# Altium PCB PCB_LogNController-v1.1.PcbDoc (part 3 of 3)
Units mil, origin at the board's own origin, x right, y up, seen from the top; angles counter-clockwise.
Board outline 7018 x 7081 mil, 2 copper layers (Top Layer, Bottom Layer), stack 61.811 mil thick; 172 components, 114 nets, 574 pads, 361 vias.
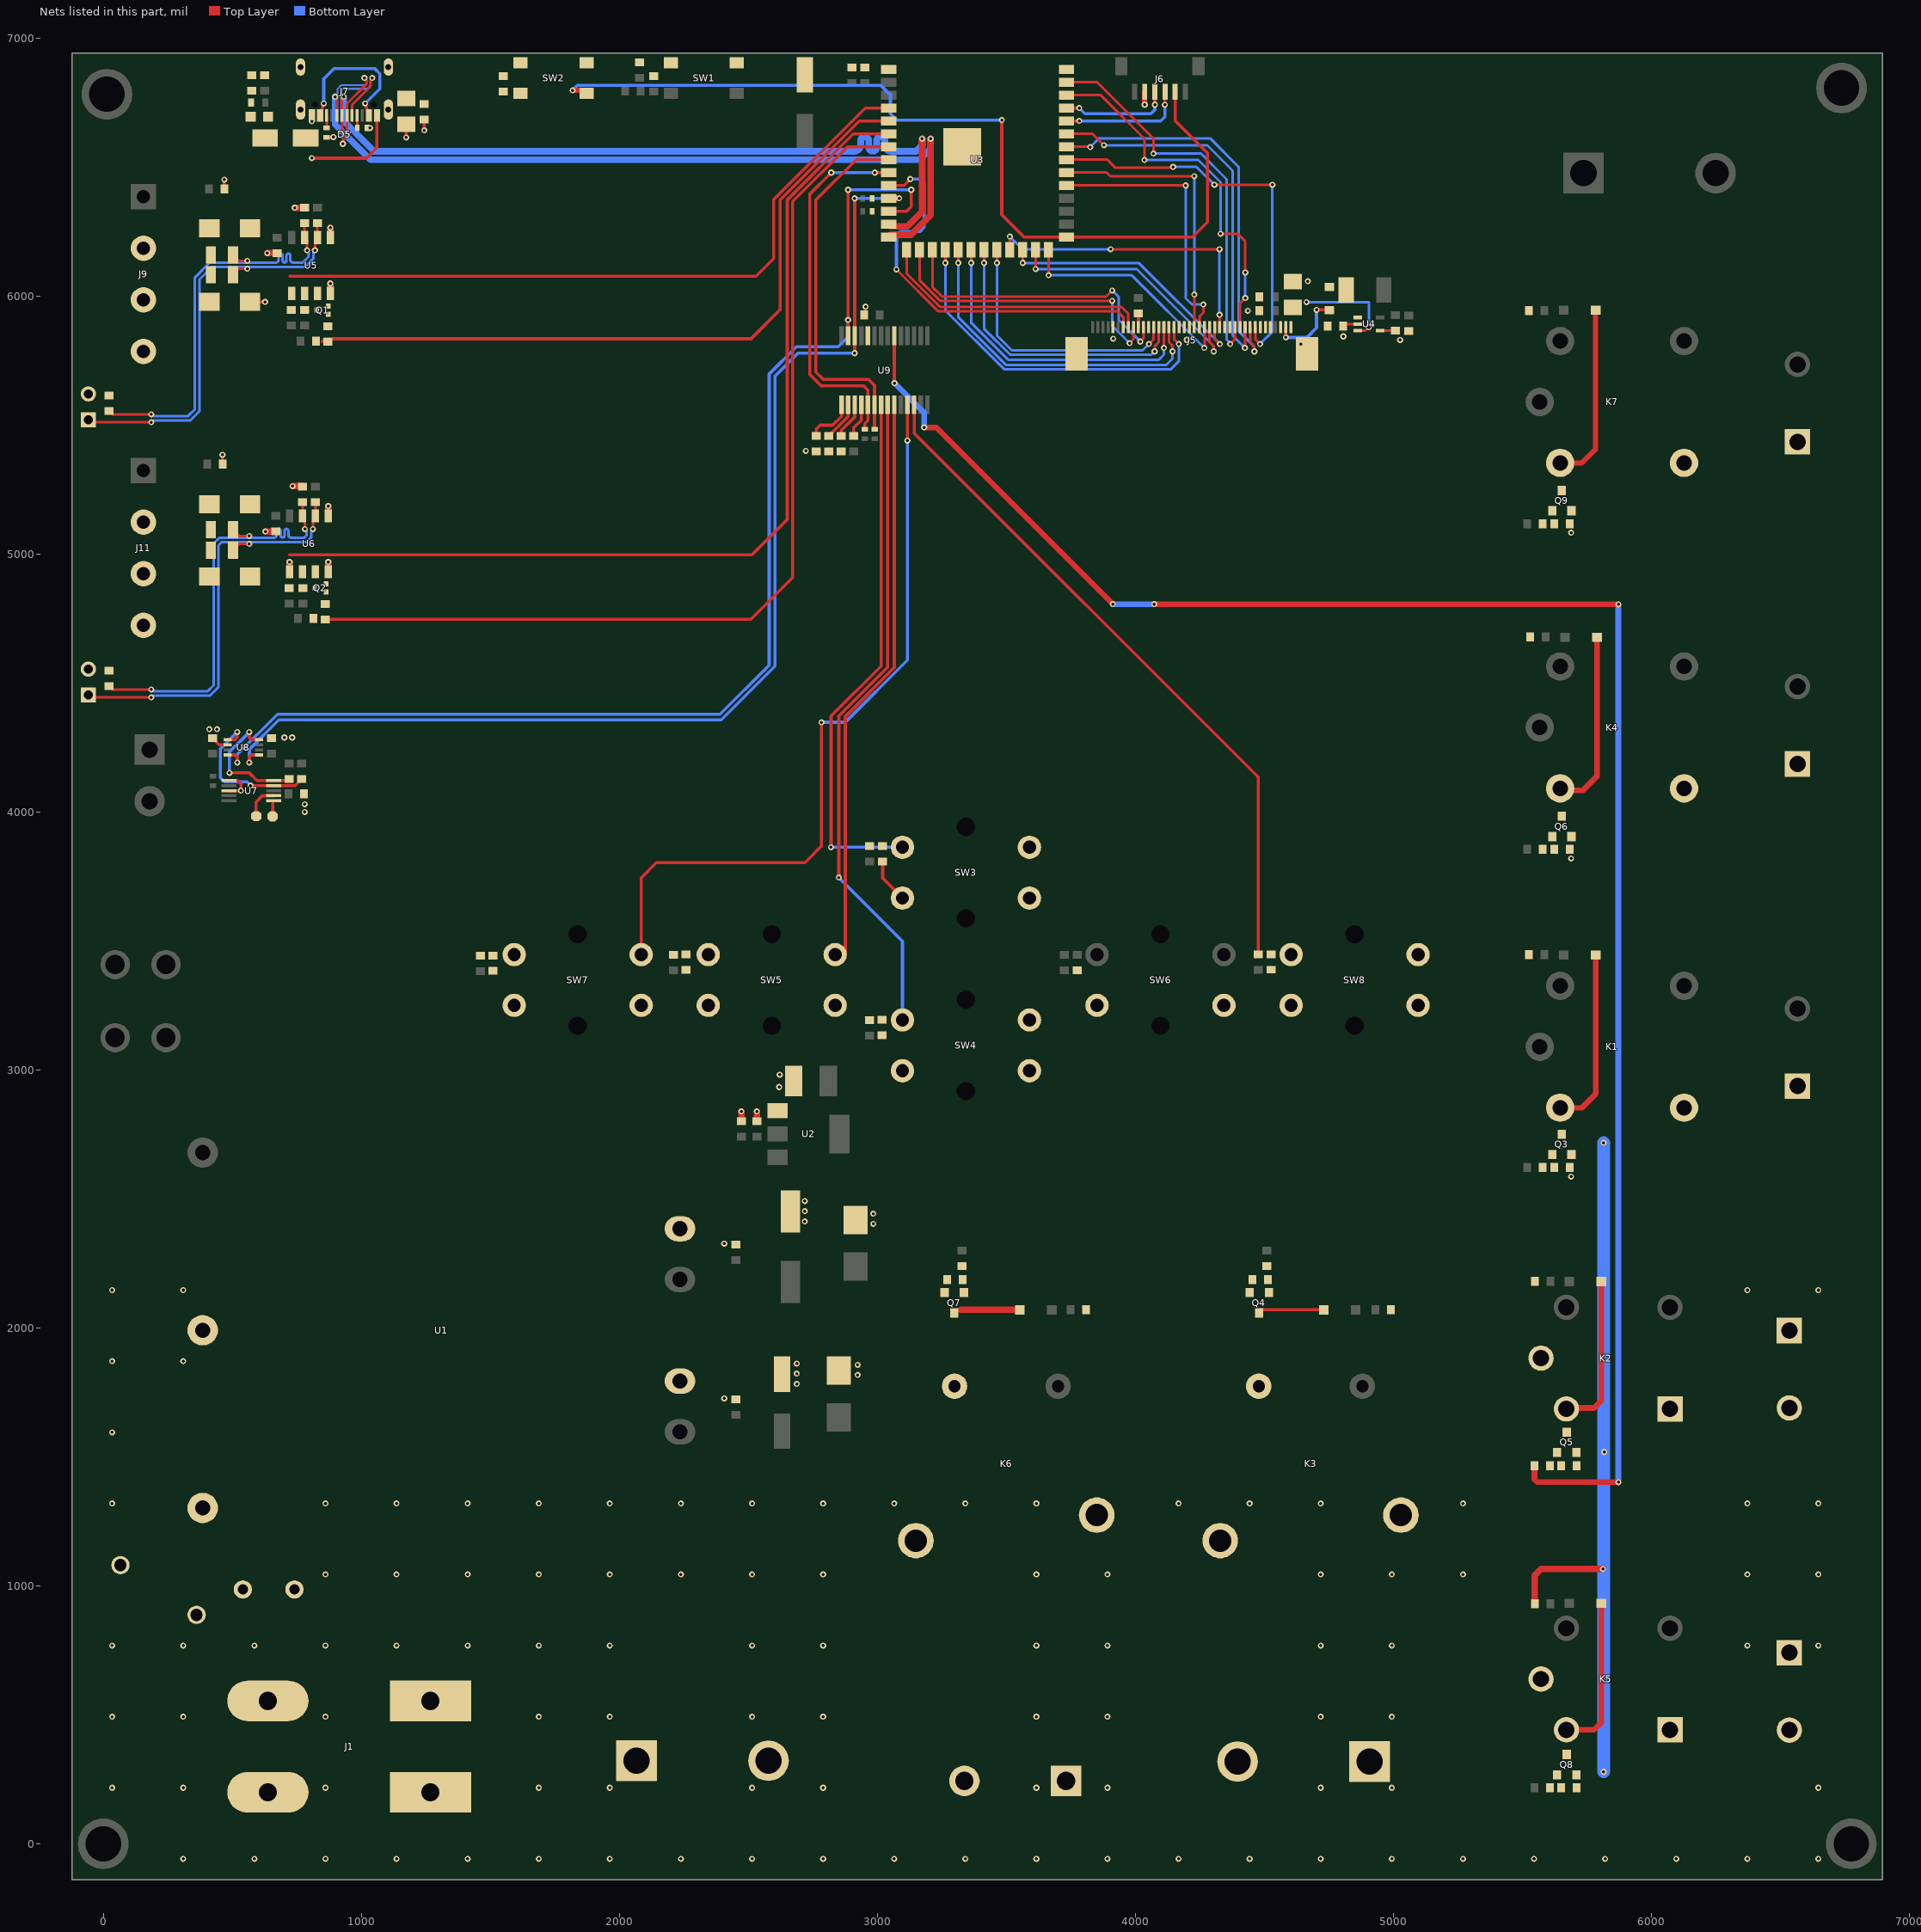
[diagram p2: the nets of this part, all layers, seen from the top]

## Via types
v1: diameter 23.62, hole 11.81, Top Layer to Bottom Layer, 245 vias
v2: diameter 23.62, hole 11.81, Top Layer to Bottom Layer, tented both sides, 116 vias

## Nets (pads, with @x,y where several pads share a name; then routed paths per layer and width w, separated by ;. In a path a pad name is that pad's centre, name@x,y a point inside that pad or via, vN(x,y) a via of type N, cw(c..) or ccw(c..) an arc to the next point about the centre after c; other vN are vias at no path point) (continued)
GND: C1.2 C2.1 C3.2 C4.1 C5.2 C6.1 C7.1 C8.1 C9.2 C10.2 C11.1 C12.1 C13.1 C14.1 C15.2 C16.1 C17.1 C18.1 C19.1 C20.1 C21.2 C22.1 C23.2 C24.1 C25.1 C26.2 C27.2 C28.2 C29.2 C30.2 C31.2 C32.2 C33.2 C34.2 C35.2 C36.2 C37.2 C38.2 C39.2 C40.2 C41.2 D1.1 D2.1 D5.1 D6.2 D7.1 D8.2 D9.1 J5.5 J5.12 J5.18 J5.19 J5.20 J5.27 J5.28 J5.34 J5.35 J5.36 J5.38 J5.MP1 J5.MP2 J6.2 J7.A1/B12 J7.B1/A12 J9.4 J11.4 Q1.2 Q2.2 Q3.2 Q4.2 Q5.2 Q6.2 Q7.2 Q8.2 Q9.2 R4.2 R5.2 R6.1 R8.1 R10.2 R17.2 R33.2 R34.2 R37.2 R39.1 R42.1 R43.1 R46.1 R47.1 R49.1 R51.1 SW1.1 SW1.2 SW2.1 SW2.2 SW3.3 SW3.4 SW4.3 SW4.4 SW5.3 SW5.4 SW6.3 SW6.4 SW7.3 SW7.4 SW8.3 SW8.4 U1.5 U1.8 U2.1 U3.1 U3.40 U3.41 U4.2 U5.4 U5.5 U6.4 U6.5 U7.1 U7.3 U8.2 U9.10 | length 4392.4
  Top Layer w10: C19.1@4806,5884.74 4813,5891.74 U4.2@4863,5891.74
  Top Layer w12: C27.2@423.51,4286 448.66,4260.84 U8.2@481.48,4260.84 ; C24.1@462,5349 v1(462,5385) ; C22.1@469,6416 v1(469,6452) ; U7.3@486.89,4083 528,4083 529,4082 v1@529.12,4082.12 ; U7.1@486.89,4122.37 520.63,4122.37 533.13,4109.87 v1(533.13,4083.12) ; D7.1@568.74,5978 v1(627,5978) ; v1(808,6535) 1020,6535 1060.71,6575.71 J7.A1/B12@1060.71,6700.99 ; v1(808,6678) 808.74,6678.74 J7.B1/A12@808.74,6700.99 ; R5.2@866,6616 891,6616 v1(892,6617) ; v1(928.67,6590.67) 930.9,6592.9 930.9,6619.37 D5.1@934.68,6623.16 ; R4.2@1021.5,6652 v1(1034,6652) ; v1(1174,6615) C20.1@1174,6667 ; v1(1244,6643) R6.1@1244,6685 ; C28.2@3021,3808 3021,3743.51 SW3.4@3097.94,3666.57 ; v1@5690,3822 v1@5690,3823
  Top Layer w20: v2(4036.94,6742.32) J6.2@4036.94,6792.3
  Top Layer w25: v1(628,5087.81) 665.92,5087.81 C23.2@666,5087.73 ; v1(636,6167) C21.2@674,6167 ; v1(734,5263.73) R17.2@772,5263.73 ; v1(742,6343) R10.2@780,6343 ; U6.4@872,4931.73 v1(872,4969.73) ; U6.5@872,5148.27 v1(872,5186.27) ; U5.4@880,6011 v1(880,6049) ; U5.5@880,6227.54 v1(880,6265.54) ; C6.1@2473.37,2802 v1(2473.37,2839.63) ; C7.1@2533.37,2802 v1(2533.37,2839.63) ; C40.2@5549,930 5549,1040 5574,1065 v1(5813,1065)
  Bottom Layer w50: v1(5816,279) 5816,1065 5816,1431 5816,1519 v1(5816,2718)
  other v1: 5818,1519 2407,1727 2688,1783 2924,1817.5 2688,1822.5 2924,1857 2688,1862 2407,2327 2985,2403.5 2719,2413 2985,2443 2719,2452.5 2719,2492 5690,2587 2620,2934 2622,2982 5690,3820 781,4000 781,4030 702,4289 732,4289 411,4321 441,4321 5690,5082.5
  other v2: 2723,5400 4641.46,5814.71 5027,5830 4199.69,5830.63 3915,5835 4807,5844 4436.63,5943.31 2954.87,5959 4669,6058
I2C_SCL: R3.1 U3.11 U8.5 U9.12 | length 4567.2
  Top Layer w12: v1(566.01,4192) 566.01,4212 575.48,4221.47 U8.5@603.53,4221.47 ; v2(2912.71,5779) U9.12@2912.71,5846.86 v2(2912.71,6379)
  Top Layer w20: U3.11@3044.31,6379.21 v2(3085,6379.21)
  Bottom Layer w12: v1(566.01,4192) 566.01,4243.01 680,4357 2395.54,4357 2604,4565.46 2604,5690 2693,5779 v2(2912.71,5779) ; v2@2912.81,6379.11 v2@3084.89,6379.11
  Bottom Layer w20: v2(2912.71,6379) v2@2912.81,6379.11 ; v2@3084.89,6379.11 v2(3085,6379.21)
I2C_SDA: R2.1 U3.12 U8.4 U9.13 | length 4827.7
  Top Layer w12: U8.4@481.48,4221.47 509.53,4221.47 519,4212 v1(519,4192) ; U9.13@2887.12,5846.86 v2(2887.12,5908) v2@2887.12,6411 ; U3.12@3044.31,6329.21 3114.21,6329.21 3132,6347 v2(3132,6412.45)
  Bottom Layer w12: v1(519,4192) 519,4222.87 675.13,4379 2390.67,4379 2581,4569.33 2581,5698 2687,5804 2849,5804 2887.12,5842.12 v2(2887.12,5908) ; v2(2887.12,6412.45) v2(3132,6412.45)
INTA: R36.1 U3.8 U9.20 | length 1432.7
  Top Layer w12: R36.1@2991,5484.5 2989.48,5486.02 U9.20@2989.48,5579.14 2989.48,5653.52 2966,5677 2791,5677 2762.24,5705.76 2762.24,6373.24 2918.21,6529.21 U3.8@3044.31,6529.21
INTB: R35.1 U3.9 U9.19 | length 1447.1
  Top Layer w12: v2(2822,6479) 2738,6395 2738,5697 2782,5653 2947,5653 2963.89,5636.11 U9.19@2963.89,5579.14 2963.89,5518.02 2952,5506.13 2952,5487.5 2952.57,5486.93 R35.1@2952.57,5484.5 ; v2(2991,6479) 2991.21,6479.21 U3.9@3044.31,6479.21
  Bottom Layer w12: v2(2822,6479) v2(2991,6479)
IO0: C15.1 J6.5 SW2.3 SW2.4 U3.27 | length 3610.4
  Top Layer w12: v2(3483,6683) 3483,6316 3569.79,6229.21 U3.27@3733.29,6229.21 4222.21,6229.21 4280,6287 4280,6555 4155.06,6679.94 J6.5@4155.06,6792.3
  Top Layer w20: v2(1819,6798) 1861.9,6798 SW2.4@1872.95,6786.95
  Bottom Layer w12: v2(1819,6798) 1839,6818 3013,6818 3051,6780 3051,6707 3075,6683 v2(3483,6683)
LCD_B3: J5.17 U3.18 | length 1388.2
  Top Layer w10: v2(3264,6129) U3.18@3264,6180 U3.18@3264.22,6180.22 ; J5.17@4150.51,5880.37 4150.54,5833.16 v2(4169,5814.71)
  Bottom Layer w10: v2(3264,6129) 3264,5945 3492,5717 4139,5717 4169,5747 v2(4169,5814.71)
LCD_B4: J5.16 U3.19 | length 1306.9
  Top Layer w10: v2(3314,6129) U3.19@3314,6180 ; J5.16@4130.86,5880.37 4130.86,5821.52 4145.19,5807.19 v2(4145.19,5785.71)
  Bottom Layer w10: v2(3314,6129) 3314,5919.04 3499.04,5734 4121,5734 4145.19,5758.19 v2(4145.19,5785.71)
LCD_B5: J5.15 U3.20 | length 1204.8
  Top Layer w10: v2(3364,6129) U3.20@3364,6180 ; v2@4110.36,5799.71 4111.18,5800.53 J5.15@4111.16,5880.37
  Bottom Layer w10: v2(3364,6129) 3364,5897.33 3507.33,5754 4092,5754 4111.36,5773.36 v2(4111.36,5799.71)
LCD_B6: J5.14 U3.21 | length 1115.7
  Top Layer w10: v2(3414,6129) U3.21@3414,6180 ; v2(4075.36,5785.71) 4075.36,5805.38 4091.49,5821.52 J5.14@4091.51,5880.37
  Bottom Layer w10: v2(3414,6129) 3414,5874.2 3515.2,5773 4062.65,5773 v2(4075.36,5785.71)
LCD_B7: J5.13 U3.22 | length 1028.8
  Top Layer w10: v2(3464,6129) U3.22@3464,6180 ; v2(4053.36,5814.71) 4071.81,5833.16 J5.13@4071.81,5880.37
  Bottom Layer w10: v2(3464,6129) 3464,5848.24 3522.24,5790 4028.65,5790 v2(4053.36,5814.71)
LCD_DE: J5.7 U3.10 | length 1572.4
  Top Layer w10: v2(3074.5,6103.5) 3237,5941 3931.7,5941 3953.71,5918.99 J5.7@3953.71,5880.37
  Top Layer w12: U3.10@3044.31,6429.21 3103.21,6429.21 v2(3128,6454)
  Bottom Layer w12: v2(3074.5,6103.5) 3074.5,6236.5 3089,6251 3166,6251 3182,6267 3182,6437 3165,6454 v2(3128,6454)
LCD_DISP: J5.10 R52.1 | length 54.3
  Top Layer w12: R52.1@4011,5934 4012.71,5932.29 J5.10@4012.71,5880.37
LCD_G2: J5.26 U3.23 | length 1191.2
  Top Layer w10: U3.23@3514,6180 v2(3514,6231) ; v2(3905,6182) v2(4327,6182) v2@4332,6182 ; v2(4327,5928) 4327.71,5927.29 J5.26@4327.71,5880.37
  Bottom Layer w10: v2(3514,6231) 3563,6182 v2(3905,6182) ; v2(4327,5928) v2(4327,6182)
LCD_G3: J5.25 U3.24 | length 1020.6
  Top Layer w10: v2(3564,6129) U3.24@3564,6180 ; J5.25@4308.01,5880.37 4308.04,5833.16 4326.5,5814.71 v2(4328.31,5814.71)
  Bottom Layer w10: v2(3564,6129) 4014.02,6129 v2(4328.31,5814.71)
LCD_G4: J5.24 U3.25 | length 1015.3
  Top Layer w10: v2@3614,6101 U3.25@3614,6180 ; J5.24@4288.36,5880.37 4288.36,5821.52 4304.5,5805.38 v2(4304.5,5785.71)
  Bottom Layer w10: v2(3614,6105) 4006,6105 4304.5,5806.5 v2(4304.5,5785.71)
LCD_G5: J5.23 U3.26 | length 900.4
  Top Layer w10: v2(3664,6081) U3.26@3664,6180 ; v2(4267.86,5799.71) 4268.68,5800.53 J5.23@4268.68,5880.37
  Bottom Layer w10: v2(3664,6081) 3986.57,6081 v2(4267.86,5799.71)
LCD_G6: J5.22 U3.31 | length 1071.7
  Top Layer w10: U3.31@3733.29,6429.21 4195.79,6429.21 v2(4196,6429) ; J5.22@4248.96,5880.37 4248.99,5920.99 4264.19,5936.19 v2(4264.19,5968)
  Bottom Layer w10: v2@4196.48,6429 4196.48,5991.52 4220,5968 v2(4264.19,5968)
LCD_G7: J5.21 U3.32 | length 1086.2
  Top Layer w10: U3.32@3733.29,6479.21 3889.79,6479.21 3904,6465 v2(4229,6465) ; J5.21@4229.31,5880.37 v2@4229.31,6006
  Bottom Layer w10: v2(4229,6006) v2(4229,6465)
LCD_HSYNC: J5.9 U3.16 | length 1158.4
  Top Layer w10: U3.16@3164,6180 3164,6062.08 3244.08,5982 v2(3911,5982) ; v2(3978,5818) 3993.01,5833.01 J5.9@3993.01,5880.37
  Bottom Layer w10: v2(3911,5982) 3911,5885 v2(3978,5818)
LCD_PCLK: J5.11 U3.17 | length 1170.4
  Top Layer w10: U3.17@3214,6180 3214,6036.12 3251.12,5999 3888,5999 v2(3911,6022) ; v2(4020,5824) 4032.41,5836.41 J5.11@4032.41,5880.37
  Bottom Layer w10: v2(3911,6022) 3936,5997 3936,5908 v2(4020,5824)
LCD_R3: J5.33 U3.33 | length 1551.1
  Top Layer w10: U3.33@3733.29,6529.21 3891.79,6529.21 3922,6499 4145,6499 v2(4147,6501) ; v2(4307,6432) v2(4532,6432) ; J5.33@4465.44,5880.37 4465.44,5833.16 v2@4483.9,5814.71
  Bottom Layer w10: v2(4147,6501) 4238,6501 v2(4307,6432) ; v2(4483.96,5814.71) 4532,5862.75 v2(4532,6432)
LCD_R4: J5.32 U3.34 | length 1570.1
  Top Layer w10: U3.34@3733.29,6579.21 3824.79,6579.21 v2(3826,6578) ; J5.32@4445.81,5880.37 4445.76,5821.52 4461.9,5805.38 v2(4461.9,5785.71)
  Bottom Layer w10: v2(3826,6578) 3860,6612 4290,6612 4402,6500 4402,5864 4461.9,5804.1 v2(4461.9,5785.71)
LCD_R5: J5.31 U3.35 | length 1491
  Top Layer w10: U3.35@3733.29,6629.21 3834.79,6629.21 v2(3879,6585) ; v2(4425.26,5799.71) 4426.08,5800.53 J5.31@4426.11,5880.37
  Bottom Layer w10: v2(3879,6585) 4279.6,6585 4378,6486.6 4378,5847.79 v2@4425.67,5800.12
LCD_R6: J5.30 U3.38 | length 1433.6
  Top Layer w10: U3.38@3733.29,6779.21 3866.79,6779.21 4036,6610 v2(4036,6528) ; v2(4331,6242) 4397,6242 4427,6212 v2(4427,6092) ; J5.30@4406.41,5880.37 4406.39,5972.39 v2(4427,5993)
  Bottom Layer w10: v2(4036,6528) 4244.67,6528 4330.81,6441.86 4330.81,6343.68 v2@4330.81,6242.19 ; v2(4427,5993) v2(4427,6092)
LCD_R7: J5.29 U3.39 | length 1528.6
  Top Layer w10: U3.39@3733.29,6829.21 3852.83,6829.21 4071,6611.04 v2(4071,6553) ; v2(4368.26,5814.71) 4386.71,5833.16 J5.29@4386.71,5880.37
  Bottom Layer w10: v2(4071,6553) 4255,6553 4354.81,6453.19 4354.81,5831.84 4368.26,5818.39 v2(4368.26,5814.71)
LCD_VSYNC: J5.8 U3.15 | length 1067.4
  Top Layer w10: U3.15@3114,6180 3114,6137 3114,6128 3114,6088.04 3244.04,5958 3947,5958 3973.41,5931.59 J5.8@3973.41,5880.37
LED_A: C19.2 D4.1 J5.39 | length 299
  Top Layer w12: v2@4583.61,5841.39 J5.39@4583.61,5880.37 ; v2@4703,5948.94 4704.74,5947.2 4745.67,5947.2 4748.46,5950 D4.1@4753,5945.46
  Bottom Layer w12: v2(4584,5840) 4666,5840 4703,5877 v2@4703,5948.94
  other v2: 4703,5946.94
LED_K: J5.40 R8.2 U4.3 | length 388.4
  Top Layer w10: U4.3@4863,5866.15 4892.74,5866.15 v2(4906.25,5879.66)
  Bottom Layer w10: v2(4664,5977) 4906.25,5977 v2(4906.25,5879.66)
NetC16_2: C16.2 F2.2 FB1.1
NetC20_2: C20.2 J7.S1 J7.S2 J7.S3 J7.S4 R6.2
NetD3_1: D3.1 F2.1
NetD3_2: D3.2 J7.A4/B9 J7.B4/A9 | length 573.4
  Top Layer w12: J7.B4/A9@840.24,6700.99 v1(854.45,6747) ; v1(1015,6747) J7.A4/B9@1029.21,6700.99
  Bottom Layer w12: v1(854.45,6747) 854.45,6842.45 895,6883 1051,6883 1072,6862 1072,6804 v1(1015,6747)
NetD4_2: D4.2 L1.2 U4.1
NetD6_1: D6.1 F3.2 J9.2
NetD7_2: D7.2 F4.2 J9.3
NetD8_1: D8.1 F5.2 J11.2
NetD9_2: D9.2 F6.2 J11.3
NetD10_1: D10.1 K1.1 Q3.3 | length 698.8
  Top Layer w20: K1.1@5647.21,2853.65 5731.65,2853.65
  Top Layer w22: 5731.65,2853.65 5785,2907 D10.1@5785,3445.87
NetD11_1: D11.1 K2.4 Q5.3 | length 609.1
  Top Layer w22: K2.4@5671.53,1689.87 5778.97,1689.87 5807.01,1717.9 D11.1@5807.01,2179.87
NetD12_1: D12.1 K3.3 Q4.3 | length 261.4
  Top Layer w12: Q4.3@4480.87,2058.63 4480.87,2070 D12.1@4730.85,2070
NetD13_1: D13.1 K4.1 Q6.3 | length 698.8
  Top Layer w22: K4.1@5652.21,4084.65 5736.65,4084.65 5790,4138 D13.1@5790,4676.87
NetD14_1: D14.1 K6.3 Q7.3 | length 229.9
  Top Layer w25: 3323,2070 D14.1@3552.86,2070
NetD15_1: D15.1 K5.4 Q8.3 | length 609.1
  Top Layer w22: K5.4@5671.56,442 5779,442 5807.03,470.03 D15.1@5807.03,932
NetD16_1: D16.1 K7.1 Q9.3 | length 698.8
  Top Layer w20: K7.1@5647.21,5353.65 5731.65,5353.65 5785,5407 D16.1@5785,5945.87
NetF1_2: F1.2 U1.3 VR1.2
NetJ7_A5: J7.A5 R4.1 | length 49.2
  Top Layer w10: J7.A5@983.94,6700.99 983.94,6652.56 R4.1@984.5,6652
NetJ7_B5: J7.B5 R5.1 | length 48.1
  Top Layer w10: J7.B5@865.83,6700.99 866,6700.82 R5.1@866,6653
NetJ8_2: J8.2 R9.2
NetJ10_2: J10.2 R16.2
NetJ13_1: J13.1 K1.2
NetJ14_2: J14.2 K2.1
NetJ15_2: J15.2 K3.2
NetJ16_1: J16.1 K4.2
NetJ17_2: J17.2 K6.2
NetJ18_2: J18.2 K5.1
NetJ19_1: J19.1 K7.2
NetQ1_1: Q1.1 R15.1
NetQ1_3: Q1.3 R13.1 U5.2 U5.3
NetQ2_1: Q2.1 R22.1
NetQ2_3: Q2.3 R20.1 U6.2 U6.3
NetQ3_1: Q3.1 R38.2 R39.2
NetQ4_1: Q4.1 R40.2 R42.2
NetQ5_1: Q5.1 R41.2 R43.2
NetQ6_1: Q6.1 R44.2 R46.2
NetQ7_1: Q7.1 R45.2 R47.2
NetQ8_1: Q8.1 R48.2 R49.2
NetQ9_1: Q9.1 R50.2 R51.2
NetR7_1: R7.1 U4.4 | length 54.6
  Top Layer w10: U4.4@4949.62,5866.15 5003.59,5866.15 R7.1@5004,5865.74
NetR32_1: R32.1 U9.18 | length 132.2
  Top Layer w12: R32.1@2909.15,5459 2909.15,5490.15 2938.3,5519.3 U9.18@2938.3,5579.14
NetR33_1: R33.1 U9.15 | length 188.9
  Top Layer w12: R33.1@2763.87,5459 2763.87,5484.87 2779,5500 2827.26,5500 2861.53,5534.27 U9.15@2861.53,5579.14
NetR34_1: R34.1 U9.16 | length 151.6
  Top Layer w12: R34.1@2812.29,5459 2813.13,5459 2887.12,5532.99 U9.16@2887.12,5579.14
NetR37_1: R37.1 U9.17 | length 141.7
  Top Layer w12: R37.1@2860.72,5459 2860.72,5479.72 2912.71,5531.71 U9.17@2912.71,5579.14
NetTP1_1: TP1.1 U7.6 | length 49.5
  Top Layer w12: TP1.1@656.51,3983 656.51,4032.51
NetTP2_1: TP2.1 U7.7 | length 132.9
  Top Layer w12: TP2.1@592.51,3984 592.51,4039.42 616.4,4063.31 U7.7@660.12,4063.31
NEUTRAL: J1.2 J2.2 J14.1 J15.1 J17.1 J18.1 U1.2 VR1.1
  other v1: 309.95,-58.23 585.54,-58.23 861.14,-58.23 1136.73,-58.23 1412.32,-58.23 1687.91,-58.23 1963.5,-58.23 2239.09,-58.23 2514.68,-58.23 2790.27,-58.23 3065.86,-58.23 3341.45,-58.23 3617.04,-58.23 3892.63,-58.23 4168.22,-58.23 4443.81,-58.23 4719.4,-58.23 4994.99,-58.23 5270.59,-58.23 5546.18,-58.23 5821.77,-58.23 6097.36,-58.23 6372.95,-58.23 6648.54,-58.23 34.36,217.36 309.95,217.36 861.14,217.36 2514.68,217.36 2790.27,217.36 3617.04,217.36 3892.63,217.36 4719.4,217.36 4994.99,217.36 6648.54,217.36 34.36,492.95 309.95,492.95 861.14,492.95 2514.68,492.95 2790.27,492.95 3617.04,492.95 3892.63,492.95 4719.4,492.95 4994.99,492.95 34.36,768.54 309.95,768.54 585.54,768.54 861.14,768.54 2514.68,768.54 2790.27,768.54 3617.04,768.54 3892.63,768.54 4719.4,768.54 4994.99,768.54 6372.95,768.54 6648.54,768.54 6372.95,1044.13 6648.54,1044.13 34.36,1319.72 6372.95,1319.72 6648.54,1319.72 34.36,1595.32 34.36,1870.91 309.95,1870.91 34.36,2146.5 309.95,2146.5 6372.95,2146.5 6648.54,2146.5
PHASE: F1.1 J1.1 J2.1 K2.5 K3.5 K5.5 K6.5
  other v1: 1687.91,217.36 1963.5,217.36 1687.91,492.95 1963.5,492.95 1136.73,768.54 1412.32,768.54 1687.91,768.54 1963.5,768.54 861.14,1044.13 1136.73,1044.13 1412.32,1044.13 1687.91,1044.13 1963.5,1044.13 2239.09,1044.13 2514.68,1044.13 2790.27,1044.13 3617.04,1044.13 3892.63,1044.13 4719.4,1044.13 4994.99,1044.13 5270.59,1044.13 861.14,1319.72 1136.73,1319.72 1412.32,1319.72 1687.91,1319.72 1963.5,1319.72 2239.09,1319.72 2514.68,1319.72 2790.27,1319.72 3065.86,1319.72 3341.45,1319.72 3617.04,1319.72 4168.22,1319.72 4443.81,1319.72 4719.4,1319.72 5270.59,1319.72
RS485-1_N: F3.1 R9.1 R10.1 U5.7 | length 1652.6
  Top Layer w10: R9.1@22,5555 35,5542 v1(186,5542) ; F3.1@503.31,6160 526.5,6136.81 v1(558,6136.81) ; R10.1@780,6283 U5.7@780,6227.54 789.69,6217.85 v1(789.69,6178)
  Bottom Layer w10: v1(186,5542) 192.31,5535.69 329,5535.69 355,5561.69 355,6072.46 413.04,6130.5 551.69,6130.5 v1(558,6136.81) 564.31,6130.5 665,6130.5 670,6130.5 ccw(c670,6140.5) 680,6140.5 680,6157.35 cw(c687.5,6157.35) 695,6157.35 695,6138 ccw(c702.5,6138) 710,6138 710,6157.35 cw(c717.5,6157.35) 725,6157.35 725,6140.5 ccw(c735,6140.5) 735,6130.5 756,6130.5 773.5,6130.5 796,6153 796,6171.69 v1(789.69,6178)
RS485-1_P: F4.1 J8.1 R14.2 U5.6 | length 1651.9
  Top Layer w10: J8.1@-58,5521 -48.38,5511.38 v1(186,5511.38) ; F4.1@503.31,6083 526.5,6106.19 v1(558,6106.19) ; v1(820.31,6178) 820.31,6217.85 U5.6@830,6227.54 830,6282 R14.2@831,6283
  Bottom Layer w10: v1(186,5511.38) 192.31,5517.69 336.46,5517.69 373,5554.23 373,6065 420.5,6112.5 551.69,6112.5 v1(558,6106.19) 564.31,6112.5 780.96,6112.5 814,6145.54 814,6171.69 v1(820.31,6178)
RS485-1_RXD: R12.1 R15.2 U3.5 | length 2798.9
  Top Layer w12: 848.5,5824.5 859,5835 2511,5835 2624,5948 2624,6373.13 2930.08,6679.21 U3.5@3044.31,6679.21
RS485-1_TXD: R11.2 U3.4 U5.1 | length 2724.6
  Top Layer w12: 724,6077 2530,6077 2599,6146 2599,6375 2953.21,6729.21 U3.4@3044.31,6729.21
RS485-2_N: F5.1 R16.1 R17.1 U6.7 | length 1667.4
  Top Layer w10: R16.1@22,4488 35,4475 v1(186,4475) ; F5.1@503.31,5095 528,5070.31 v1(566,5070.31) ; R17.1@772,5202 U6.7@772,5148.27 781.69,5138.58 v1(781.69,5097)
  Bottom Layer w10: v1(186,4475) 192.31,4468.69 405,4468.69 428,4491.69 428,5041.46 450.54,5064 559.69,5064 v1(566,5070.31) 572.31,5064 657.35,5064 662.35,5064 ccw(c662.35,5074) 672.35,5074 672.35,5090.28 cw(c679.85,5090.28) 687.35,5090.28 687.35,5071.5 ccw(c694.85,5071.5) 702.35,5071.5 702.35,5090.28 cw(c709.85,5090.28) 717.35,5090.28 717.35,5074 ccw(c727.35,5074) 727.35,5064 749,5064 779,5064 788,5073 788,5090.69 v1(781.69,5097)
RS485-2_P: F6.1 J10.1 R21.2 U6.6 | length 1668.6
  Top Layer w10: J10.1@-58,4454 -48.38,4444.38 v1(186,4444.38) ; F6.1@503.31,5015 528,5039.69 v1(566,5039.69) ; v1(812.31,5097) 812.31,5138.58 U6.6@822,5148.27 R21.2@822,5202
  Bottom Layer w10: v1(186,4444.38) 192.31,4450.69 412.46,4450.69 446,4484.23 446,5034 458,5046 559.69,5046 v1(566,5039.69) 572.31,5046 786.46,5046 806,5065.54 806,5090.69 v1(812.31,5097)
RS485-2_RXD: R19.1 R22.2 U3.7 | length 3797.3
  Top Layer w12: R22.2@860,4747 2510,4747 2672.3,4909.31 2672.3,6367.31 2884.21,6579.21 U3.7@3044.31,6579.21
RS485-2_TXD: R18.2 U3.6 U6.1 | length 3761.9
  Top Layer w12: 722,4998 2515,4998 2651,5134 2651,6373.26 2906.95,6629.21 U3.6@3044.31,6629.21
  Top Layer w25: U6.1@722,4931.73 v1(722,4969.73)
RXD0: J6.4 U3.36 | length 485.2
  Top Layer w12: U3.36@3733.29,6679.21 v2(3783.27,6679.21) ; v2@4115.53,6742.16 J6.4@4115.53,6792.14
  Top Layer w20: v2(4115,6741.63) v2@4115.53,6742.16 ; J6.4@4115.53,6792.14 J6.4@4115.69,6792.3
  Bottom Layer w12: v2(3783.27,6679.21) 4098.21,6679.21 4115,6696 v2(4115,6741.63)
SCL_5V: R25.1 U7.10 U8.8 | length 497.3
  Top Layer w12: v1(489,4152) 490,4153 564.51,4153 595.14,4122.37 U7.10@660.12,4122.37 713.88,4122.37 R25.1@719.51,4128 ; v1(566.01,4310) 566.01,4290 575.48,4280.53 U8.8@603.53,4280.53
  Bottom Layer w12: v1(489,4152) 489,4232.99 v1(566.01,4310)
SCROLL_DOWN: C29.1 R27.2 SW4.1 SW4.2 U9.22 | length 2566
  Top Layer w12: v2(2851,3746) 2851,4371.87 3040.66,4561.53 U9.22@3040.66,5579.14
  Bottom Layer w12: v2(2851,3746) 3097.94,3499.06 SW4.2@3097.94,3194
SCROLL_UP: C28.1 R26.2 SW3.1 SW3.2 U9.21 | length 2077.1
  Top Layer w12: v2(2821,3863.42) 2821,4372 3015.07,4566.07 U9.21@3015.07,5579.14
  Bottom Layer w12: v2@2817,3863.42 SW3.2@3097.94,3863.43
SDA_5V: R24.1 U7.9 U8.1 | length 602.5
  Top Layer w12: U8.1@481.48,4280.53 509.53,4280.53 519,4290 v1(519,4310) ; v1@571.31,4102.69 U7.9@660.12,4102.69 743.19,4102.69 R24.1@768.51,4128
  Bottom Layer w12: v1(519,4310) 454,4245 454,4133 470,4117 557,4117 v1(571,4103)
SELECT: C30.1 R28.2 SW5.1 SW5.2 U9.23 | length 2210.5
  Top Layer w12: SW5.1@2876.06,3447.43 2876.06,4370.06 3066.25,4560.25 U9.23@3066.25,5579.14
START: C32.1 R30.2 SW7.1 SW7.2 U9.25 | length 2947.7
  Top Layer w12: SW7.1@2085.06,3447.43 2085.06,3745.06 2144,3804 2717,3804 ; 2720,3804 2784,3868 v2(2784,4348.01) ; v2(3117,5440) 3117.43,5440.43 U9.25@3117.43,5579.14
  Bottom Layer w12: v2(2784,4348.01) 2876.01,4348.01 3117,4589 v2(3117,5440)
STOP: C33.1 R31.2 SW8.1 SW8.2 U9.26 | length 2683.6
  Top Layer w12: U9.26@3143.02,5579.14 3143.02,5469.08 4476.67,4135.43 R31.2@4476.67,3448
TXD0: J6.3 U3.37 | length 428.5
  Top Layer w12: U3.37@3733.29,6729.21 v2(3783.27,6729.21) ; v2(4076.32,6742.32) J6.3@4076.32,6792.3
  Bottom Layer w12: v2(3783.27,6729.21) 3805.48,6707 4061,6707 4076.32,6722.32 v2(4076.32,6742.32)
USB_D_N: D5.3 J7.A7 J7.B7 U3.13 | length 3529.1
  Top Layer w10: D5.3@915,6633 926.18,6644.18 926.18,6699.69 J7.A7@924.88,6700.99 924.88,6767.53 930.35,6773 v1(931.54,6773) ; J7.B7@964.25,6700.99 964.25,6742.25 1035.81,6813.81 1035.81,6839.19 v1(1042.62,6846)
  Top Layer w26: U3.13@3044.31,6279.21 3052.81,6270.71 3117,6270.71 3174,6327.71 v2(3174,6610)
  Bottom Layer w7: v1(931.54,6773) 922.04,6782.5 922.04,6798 928.04,6804 1022.11,6804 1034.31,6816.2 1034.31,6837.69 v1(1042.62,6846)
  Bottom Layer w26: v1(931.54,6773) 931.54,6679.46 1049,6562 2819.39,6562 2910,6562 ccw(c2910,6588) 2936,6588 2936,6602.75 cw(c2951.5,6602.75) 2967,6602.75 2967,6577.5 ccw(c2982.5,6577.5) 2998,6577.5 2998,6602.75 cw(c3013.5,6602.75) 3029,6602.75 3029,6588 ccw(c3055,6588) 3055,6562 3099,6562 3151,6562 3174,6585 v2(3174,6610)
USB_D_P: D5.2 J7.A6 J7.B6 U3.14 | length 3530.4
  Top Layer w10: v1(898.54,6773) 899.73,6773 905.2,6767.53 J7.B6@905.2,6700.99 ; D5.2@954.37,6633 944.57,6642.8 J7.A6@944.57,6700.99 944.57,6746.61 1018.81,6820.85 1018.81,6839.19 v1(1012,6846)
  Top Layer w26: U3.14@3044.31,6229.21 3052.81,6237.71 3130.67,6237.71 3207,6314.04 v2(3207,6610)
  Bottom Layer w7: v1(898.54,6773) 908.04,6782.5 908.04,6803.8 922.24,6818 1016.31,6818 1020.31,6822 1020.31,6837.69 v1(1012,6846)
  Bottom Layer w26: v1(898.54,6773) 898.54,6665.79 1035.33,6529 3164.67,6529 3207,6571.33 v2(3207,6610)
UV_LIGHT_5A: R41.1 U9.6 | length 7163.4
  Top Layer w12: v2@3066.25,5663.75 U9.6@3066.25,5846.86
  Top Layer w22: v2@3066.25,5663.75 v2(3067,5663) ; v2(3182,5491) 3229,5491 v2@3913.5,4806.5 ; v2(4074,4806) v1@5872,4806 ; R41.1@5548,1466 5548,1413 5559,1402 v1(5873,1402)
  Bottom Layer w22: v2(3067,5663) 3182,5548 v2(3182,5491) ; v2(3913,4806) v2(4074,4806) ; v1(5873,1402) v1(5873,4805)
pads on no net: J5.1 J5.2 J5.3 J5.4 J5.6 J6.MP1 J6.MP2 J7.A8 J7.B8 J7.MH K1.3 K2.2 K4.3 K5.2 K7.3 SW3.MH SW4.MH SW5.MH SW6.MH SW7.MH SW8.MH U3.28 U3.29 U3.30 U9.11 U9.14 U9.27 U9.28

## Polygon pours and split planes (outlines as drawn)
3V3 on Top Layer "3V3_L01_P000" (solid, remove dead copper, pour order 0): 1972,6317 1779,6317 1779,6388 1972,6388 1972,6819 2048,6819 2048,6732 2796,6732 2796,6851 3263,6851 3263,6721 3113,6721 3113,6806 2834,6806 2834,6317
GND on Top Layer "GND_L01_P042" (solid, remove dead copper, pour order 42): 3157,2102 3514,2102 3514,2031 4404,2031 4404,2109 4968,2109 4968,2039 5571,2039 5571,2578 5585,2577 6891,2577 6891,6942 -115,6942 -115,3776 1377,3776 1377,3071 2158,3071 2158,1711 3157,1711
STOP on Top Layer "STOP_L01_P069" (solid, remove dead copper, pour order 69): 4712.67,3395.01 4967.67,3395.01 5155,3395.01 5155,3605.01 4449.67,3605.01 4449.67,3435.01 4549.67,3435.01 4549.67,3395.01
BACK_HOME on Top Layer "BACK_HOME_L01_P068" (solid, remove dead copper, pour order 68): 3960,3395.01 4215,3395.01 4400,3395.01 4400,3605.01 3697,3605.01 3697,3430 3803,3430 3803,3395.01
SCROLL_DOWN on Top Layer "SCROLL_DOWN_L01_P067" (solid, remove dead copper, pour order 67): 3206,3141.58 3461,3141.58 3653,3141.58 3653,3351.58 2943,3351.58 2943,3181.58 3043,3181.58 3043,3141.58
SCROLL_UP on Top Layer "SCROLL_UP_L01_P066" (solid, remove dead copper, pour order 66): 3206,3811.01 3461,3811.01 3651,3811.01 3651,4021.01 2943,4021.01 2943,3851.01 3043,3851.01 3043,3811.01
SELECT on Top Layer "SELECT_L01_P065" (solid, remove dead copper, pour order 65): 2461.94,3393.58 2716.94,3393.58 2895,3393.58 2895,3603.58 2190,3603.58 2190,3433.58 2298.94,3433.58 2298.94,3393.58
START on Top Layer "START_L01_P014" (solid, remove dead copper, pour order 14): 1701,3390 1956,3390 2128,3390 2128,3600 1438,3600 1438,3430 1538,3430 1538,3390
PHASE on Top Layer "PHASE_L01_P029" (solid, remove dead copper, pour order 29): 991,860 991,95 2250,95 2250,860 2929,860 2929,1303 3562,1303 3562,852 4145,852 4145,1303 4684,1303 4684,860 5303,860 5303,554 5639,554 5639,726 5484,726 5484,1788 5639,1788 5639,1974 5315,1974 5315,1415 700,1415 700,860
NetD3_2 on Top Layer "NETD3_2_L01_P001" (solid, remove dead copper, pour order 1): 851,6725 851,6575 726,6575 726,6654 829,6654 829,6725
NEUTRAL on Top Layer "NEUTRAL_L01_P056" (solid, remove dead copper, pour order 56): 6729,280 6459,280 6459,92 5239,92 5239,787 4689,787 4689,16 4145,16 4145,787 3569,787 3569,16 2990,16 2990,787 2347,787 2347,16 881,16 881,787 183,787 183,1676 602,1676 602,2305 -121,2305 -121,-139 6897,-139 6897,2200 6319,2200 6319,1888 6729,1888 6729,1575 6309,1575 6309,630 6729,630
E-GND on Top Layer "E-GND_L01_P054" (solid, remove dead copper, pour order 54): -120,2360 596,2360 596,3503 -120,3503
GND on Top Layer "GND_L01_P040" (solid, remove dead copper, pour order 40): 2955.37,5810 2955.37,5909 2932,5909 2932,5974 2973.37,5974 2973.37,5810
3V3 on Top Layer "3V3_L01_P039" (solid, remove dead copper, pour order 39): 2998,5810 2998,5909 3026,5909 3026,5974 2980,5974 2980,5810
3V3 on Top Layer "3V3_L01_P038" (solid, remove dead copper, pour order 38): 2890,5380 2890,5420 2939,5420 2939,5460 3004,5460 3004,5380
AIN0 on Top Layer "AIN0_L01_P026" (solid, remove dead copper, pour order 26): 515,4055 297,4055 297,4138 -114,4138 -114,4350 384,4350 384,4072 515,4072
NetD9_2 on Top Layer "NETD9_2_L01_P036" (solid, remove dead copper, pour order 36): 472,5014 472,5053 368,5053 368,5014 -113,5014 -113,4810 472,4810
NetD8_1 on Top Layer "NETD8_1_L01_P035" (solid, remove dead copper, pour order 35): 205,5019 205,5061 467,5061 467,5237 351,5237 351,5209 -118,5209 -118,5019
3V3 on Top Layer "3V3_L01_P027" (solid, remove dead copper, pour order 27): 620,4247 620,4235 443,4235 443,4130 404,4130 404,4247 497,4247
AIN1 on Top Layer "AIN1_L01_P025" (solid, remove dead copper, pour order 25): 515,3938 -116,3938 -116,4128 289,4128 289,4051 515,4051
5V on Top Layer "5V_L01_P024" (solid, remove dead copper, pour order 24): 631,4077 697,4077 697,4019 753,4019 753,4090 631,4090
5V on Top Layer "5V_L01_P023" (solid, remove dead copper, pour order 23): 586,4270 586,4254 629,4254 629,4160 799,4160 799,4270
5V on Top Layer "5V_L01_P013" (solid, remove dead copper, pour order 13): 2159,2280.55 2159,1938 2969,1938 2969,2300.55 2539,2300.55 2539,2280.55
12V_SENSORS on Top Layer "12V_SENSORS_L01_P012" (solid, remove dead copper, pour order 12): 2159,1691 2159,1500 2919,1500 2919,1710 2539,1710 2539,1691
DCPUMP_GND on Top Layer "DCPUMP_GND_L01_P011" (solid, remove dead copper, pour order 11): 6879,6935 6879,3110 6304.5,3110 6304.5,3460 6679,3460 6679,4335 6304,4335 6304,4685 6679,4685 6679,5635 6004,5635 6004,6935
12V_SENSORS on Top Layer "12V_SENSORS_L01_P006" (solid, remove dead copper, pour order 6): 427,5424 427,5332 243,5332 243,5239 -115,5239 -115,5424
NetD7_2 on Top Layer "NETD7_2_L01_P005" (solid, remove dead copper, pour order 5): 472,6076 472,6115 368,6115 368,6076 -113,6076 -113,5872 472,5872
NetD6_1 on Top Layer "NETD6_1_L01_P004" (solid, remove dead copper, pour order 4): 210,6086 210,6128 472,6128 472,6304 356,6304 356,6276 -113,6276 -113,6086
12V_SENSORS on Top Layer "12V_SENSORS_L01_P003" (solid, remove dead copper, pour order 3): 427,6486 427,6394 243,6394 243,6301 -115,6301 -115,6486
NetC20_2 on Top Layer "NETC20_2_L01_P002" (solid, remove dead copper, pour order 2): 739,6680 739,6936 1283,6936 1283,6729 1130,6729 1130,6680 1082,6680 1082,6837 792,6837 792,6680
5V on Bottom Layer "5V_L02_P043" (solid, remove dead copper, pour order 43): 2159,1938 2159,3936 632,3936 632,4206 1276,4206 2881,4206 2881,1938
5V on Bottom Layer "5V_L02_P037" (solid, remove dead copper, pour order 37): 2159,2965 2159,1938 3570,1938 3570,1708 4959,1708 4959,2032 5783,2032 5783,6000 5644,6000 5644,2965
GND on Bottom Layer "GND_L02_P064" (solid, remove dead copper, pour order 64): 2158,2881 6891,2881 6891,6942 -115,6942 -115,3776 1376,3776 1376,3071 2158,3071
12V_SENSORS on Bottom Layer "12V_SENSORS_L02_P050" (solid, remove dead copper, pour order 50): 2928,1498 1687,1498 1687,3636 -118,3636 -118,6486 540,6486 540,3896 2119,3896 2119,1699 2928,1699
3V3 on Bottom Layer "3V3_L02_P044" (solid, remove dead copper, pour order 44): 1039,4355 441,4355 441,4152 297,4152 297,4438 464,4438 464,4846 892,4846 892,6361 1039,6361 1039,4846
PHASE on Bottom Layer "PHASE_L02_P058" (solid, remove dead copper, pour order 58): 991,860 991,95 2250,95 2250,860 2953,860 2953,1303 3562,1303 3562,852 4145,852 4145,1303 4684,1303 4684,860 5303,860 5303,554 5639,554 5639,726 5484,726 5484,1788 5639,1788 5639,1974 5315,1974 5315,1415 700,1415 700,860
3V3 on Bottom Layer "3V3_L02_P047" (solid, remove dead copper, pour order 47): 4010,6851 4010,6854 4499,6854 4499,6029 4455,6029 4455,6786 4010,6786 4010,6721 3112,6721 3112,6851
NEUTRAL on Bottom Layer "NEUTRAL_L02_P057" (solid, remove dead copper, pour order 57): 6729,280 6459,280 6459,92 5239,92 5239,787 4689,787 4689,16 4145,16 4145,787 3569,787 3569,16 2990,16 2990,787 2347,787 2347,16 881,16 881,787 183,787 183,1676 604,1676 604,2305 -121,2305 -121,-139 6897,-139 6897,2200 6319,2200 6319,1888 6729,1888 6729,1575 6309,1575 6309,630 6729,630
E-GND on Bottom Layer "E-GND_L02_P055" (solid, remove dead copper, pour order 55): -120,2360 597,2360 597,3503 -120,3503
3V3 on Bottom Layer "3V3_L02_P053" (solid, remove dead copper, pour order 53): 2928,5733 3017.5,5733 3017.5,5443 3107,5443 3107,5332 2928,5332
3V3 on Bottom Layer "3V3_L02_P046" (solid, remove dead copper, pour order 46): 630,6313 630,6265 852,6265 852,6318 1921,6318 1921,6389 760,6389 760,6313
3V3 on Bottom Layer "3V3_L02_P045" (solid, remove dead copper, pour order 45): 621,5232 621,5184 843,5184 843,5237 1039,5237 1039,5284 751,5284 751,5232
12V-PUMP on Bottom Layer "12V-PUMP_L02_P021" (solid, remove dead copper, pour order 21): 5989,6940 5989,6020 5619,6020 5619,5510 5619,3000 5419,3000 5419,6940

## Other copper
Top Layer:
  rectangle net GND: 2600,2892 2713,3020
  rectangle net GND: 2623,2357 2745,2543
  rectangle net GND: 2869,2354 3007,2474
  rectangle net GND: 5669,2572 5713,2693
  rectangle net GND: 5669,5067.5 5713,5188.5
  rectangle net GND: 5669,3805 5713,3926
  rectangle net NetD14_1: 3250.61,1715 3353.61,2083
  rectangle net NetJ15_2: 4306,116 4488,727
  rectangle net 12V-PUMP: 5421,6116 5989,6926.71
  rectangle net NetJ17_2: 3071,543 3227.61,1236
  rectangle net NetJ15_2: 4250.39,543 4407,1236
  rectangle net NetJ17_2: 3082,543 3427,726
  rectangle net NetJ17_2: 3255,117 3428,615
  rectangle net LED_K: 4597,5855 4678,5990
  rectangle net 3V3: 4523,5926 4563,6064
  rectangle net 3V3: 4538,5855 4550,6007
  rectangle net LED_K: 4576,5923 4647,5990
  rectangle net NetJ10_2: -105.71,4518 43,4606
  rectangle net NetTP2_1: 560,3958 620,4051
  rectangle net NetTP1_1: 628,3957 688,4050
  rectangle net 5V: 2441,2610 2559,2760
  rectangle net GND: 5689,1448 5841,1538
  rectangle net NetF1_2: 251,851 645,1443
  rectangle net 3V3: 2941,2670 2992,3153
  region net NetD15_1: 5735,490 5613,490 5613,316.35 5735,316.35
  rectangle net 3V3: 630,6202 748,6297
  rectangle net GND: 2704,5381 2879,5420
  rectangle net NetQ4_1: 4491,2120 4536,2255
  rectangle net NetQ7_1: 3309,2120 3354,2255
  rectangle net NetD12_1: 4430,1715 4533,2081
  rectangle net 5V: 3630,1715 3776.61,2104
  rectangle net 5V: 4819,1715 4961,2104
  region net GND: 5897,299 5693,299 5693,198.13 5897,198.13
  rectangle net 5V: 5593.34,785 5743.34,1009.62
  rectangle net 5V: 5590.79,2039 5740.79,2261.91
  region net LED_A: 4774,5963 4717,5963 4717,5865 4774,5865
  rectangle net 5V: 4928.62,5910 5080,6077
  region net NetD4_2: 4879,6077 4734,6077 4734,6020 4879,6020
  region net NetD4_2: 4880,6077 4781,6077 4781,5910 4880,5910
  rectangle net NetJ13_1: 6049,2780.2 6639,3000.2
  rectangle net NetJ16_1: 6049,4018.2 6639,4238.2
  rectangle net NetJ8_2: -105.71,5586 42,5678
  rectangle net 5V: 5569,3260.2 5719,3500.2
  rectangle net 5V: 5569,4498.2 5719,4738.2
  rectangle net 5V: 5569,5760 5719,6000
  rectangle net NetJ19_1: 6049,5280 6639,5500
  rectangle net 3V3: 2769,2670 2992,3020
  rectangle net 3V3: 2569,2720 2889,2790
  rectangle net 5V: 2452.37,2610 2659,2700
  rectangle net NetJ14_2: 6020,1634 6629,1794.16
  rectangle net NetQ8_1: 5581,198.13 5666,288.13
  rectangle net NetQ5_1: 5581,1448 5666,1538
  region net NetD11_1: 5735,1735 5612,1735 5612,1556.52 5735,1556.52
  rectangle net NetQ3_1: 5562,2603 5642,2693
  rectangle net NetQ6_1: 5562,3836 5642,3926
  rectangle net NetQ9_1: 5562,5098 5642,5188
  rectangle net NetD10_1: 5570,2724.2 5750,2921.2
  rectangle net NetD13_1: 5570,3962.2 5750,4159.2
  rectangle net NetD16_1: 5570,5224 5750,5421
  rectangle net NetJ18_2: 6020,380 6629,550
  rectangle net 3V3: 621,5122.73 739,5216
  rectangle net NetQ2_3: 752,4850.73 838,4962.73
  region net RS485-2_TXD: 738,5005 699,5005 699,4850.73 738,4850.73
  region net 3V3: 639,4826.73 639,4725.73 790.46,4725.73 790.46,4826.73
  rectangle net NetQ2_1: 845,4788.73 882,4863.73
  region net RS485-2_RXD: 882,4725.73 882,4773 799,4773 799,4725.73
  region net RS485-1_RXD: 890,5805 890,5844 807,5844 807,5805
  rectangle net NetQ1_1: 853,5868 890,5943
  region net 3V3: 707,5906 707,5805 798.46,5805 798.46,5906
  region net RS485-1_TXD: 746,6083 707,6083 707,5930 746,5930
  rectangle net NetQ1_3: 760,5930 846,6042
  rectangle net NetD3_1: 575,6575 679,6651
  rectangle net NetD3_1: 619,6575 679,6716
  rectangle net 5V: 607,6731 692,6814
  rectangle net NetC16_2: 550,6675 594,6811
  rectangle net I2C_SDA: 2970,6310 3074,6349
  rectangle net I2C_SCL: 2970,6360 3074,6399
  rectangle net IO0: 1529,6764 1901,6831
  rectangle net ESP-EN: 2060,6766 2095,6861
  rectangle net ESP-EN: 2060,6764 2518,6814
Bottom Layer:
  rectangle net GND: 2159,1714 2945,1922
  rectangle net GND: 2160,2298 3010,2549
  rectangle net NetJ15_2: 4250.39,543 4407,1236
  rectangle net NetJ15_2: 4306,116 4489,725
  rectangle net NetJ17_2: 3255,117 3428,615
  rectangle net NetJ17_2: 3082,543 3427,726
  rectangle net NetJ17_2: 3071,543 3227.61,1237
  region net DCPUMP_GND: 6567,6926.71 6004,6926.71 6004,6116 6567,6116
  rectangle net GND: 765,3984 796,4053
  rectangle net NetF1_2: 251,851 645,1443

## Silkscreen, mask and mechanical layers (free items; w line width, h text height)
Top Overlay:
  drawing of 17 lines, arcs and shapes, not listed
  text "LogNController - v1.1" at 4328.75,6848.38 h115
  text "12V-PUMP" at 5422.33,6843.13 h100
  text "GND-PUMP" at 6004.81,6843.13 h100
  text "RS-485 CHANNEL - 1" at -115,6489 h80 r270
  text "RS-485 CHANNEL - 2" at -116,5425 h80 r270
  text "DC PUMP - 3" at 6888.43,5221.5 h100 r90
  text "ADC" at -116,4336.84 h100 r270
  text "DC PUMP - 2" at 6888.43,3972.73 h100 r90
  text "E-GND" at -112,3449.5 h100 r270
  text "AC to DC MODULE" at 215,2887.53 h100
  text "DC PUMP - 1" at 6888.43,2721.28 h100 r90
  text "UV LIGHT" at 6888.43,1473.9 h100 r90
  text "AIR PUMP [3A]" at 6888.43,227 h100 r90
  text "AC INPUT" at 249.25,-133.48 h100
  text "AC OUTPUT" at 1673.62,-133.48 h100
  text "AC MOTOR" at 3074,-135.43 h100
  text "AIR PUMP [15A]" at 4080,-135.43 h100
Bottom Overlay:
  lines w5: 5087.29,3112.67 5087.62,3113
  text "GND" at 6803.57,5650.67 h70 r270
  text "N_OPEN" at 6803.57,5219.67 h70 r270
  text "GND" at 6803.57,4399.67 h70 r270
  text "SCROLL_UP" at 3624.19,4001.57 h90
  text "N_OPEN" at 6803.57,3972.67 h70 r270
  text "START" at 2119.19,3584.57 h90
  text "SELECT" at 2871.19,3584.57 h90
  text "BACK-HOME" at 4380,3584.57 h90
  text "STOP" at 5130.86,3584.57 h90
  text "GND" at 6803.57,3149.67 h70 r270
  text "SCROLL_DOWN" at 3629.5,2764.57 h80
  text "N_OPEN" at 6803.57,2715.67 h70 r270
  text "NEUTRAL" at 6803.57,1896.67 h70 r270
  text "N_OPEN" at 6803.57,1474.67 h70 r270
  text "NEUTRAL" at 6803.57,656.67 h70 r270
  text "N_OPEN" at 6803.57,223.67 h70 r270
  text "NEUTRAL" at 885.26,-134.43 h100
  text "PHASE" at 2148,-134.43 h100
  text "NEUTRAL" at 2829.26,-134.43 h100
  text "N_OPEN" at 3414.08,-134.43 h100
  text "NEUTRAL" at 4039.34,-134.43 h100
  text "N_OPEN" at 4591,-134.43 h100
  text "NEUTRAL" at 5216.26,-134.43 h100
Dimension:
  lines w5: 3725.03,5171 3725.03,5879.66 3793.43,5879.66 3835.61,5879.66 ; 4603.37,5879.66 4645.6,5879.66 4714,5879.66 4714,5171
Fabrication:
  drawing of 191 lines, arcs and shapes, not listed
  text "Layer" at 7871.74,2991 h60
  text "Name" at 8281.65,2991 h60
  text "Material" at 9211.4,2991 h60
  text "Thickness" at 10071.16,2991 h60
  text "Constant" at 10721,2991 h60
  text "Board Layer Stack" at 11290.86,2991 h60
  text "Top Overlay" at 8281.65,2871 h60
  text "Top Solder" at 8281.65,2751 h60
  text "Solder Resist" at 9211.4,2751 h60
  text "0.39mil" at 10071.16,2751 h60
  text "3.5" at 10721,2751 h60
  text "1" at 7871.74,2631 h60
  text "Top Layer" at 8281.65,2631 h60
  text "1.38mil" at 10071.16,2631 h60
  text "Dielectric 1" at 8281.65,2511 h60
  text "FR-4" at 9211.4,2511 h60
  text "59.06mil" at 10071.16,2511 h60
  text "4.8" at 10721,2511 h60
  text "2" at 7871.74,2391 h60
  text "Bottom Layer" at 8281.65,2391 h60
  text "1.38mil" at 10071.16,2391 h60
  text "Bottom Solder" at 8281.65,2271 h60
  text "Solder Resist" at 9211.4,2271 h60
  text "0.39mil" at 10071.16,2271 h60
  text "3.5" at 10721,2271 h60
  text "Bottom Overlay" at 8281.65,2151 h60
  text "Total board thickness:" at 7871.74,2031 h60
  text "62.60mil" at 10071.16,2031 h60
Board Outline:
  drawing of 216 lines, arcs and shapes, not listed
Drill Drawing:
  drawing of 188 lines, arcs and shapes, not listed
  text "Symbol" at 7827.74,6765 h72
  text "Count" at 8333.62,6765 h72
  text "Hole Size" at 8923.46,6765 h72
  text "Plated" at 10073.12,6765 h72
  text "Hole Type" at 10579,6765 h72
  text "Drill Layer Pair" at 11312.8,6765 h72
  text "Via/Pad" at 12812.35,6765 h72
  text "Pad Shape" at 13402.2,6765 h72
  text "Template" at 14148,6765 h72
  text "Hole Length" at 15497.6,6765 h72
  text "Routed Path Length" at 16647.26,6765 h72
  text "361" at 8333.62,6615 h60
  text "11.81mil (0.300mm)" at 8923.46,6615 h60
  text "PTH" at 10073.12,6615 h60
  text "Round" at 10579,6615 h60
  text "Top Layer - Bottom Layer" at 11312.8,6615 h60
  text "Via" at 12812.35,6615 h60
  text "Rounded" at 13402.2,6615 h60
  text "(Mixed)" at 14148,6615 h60
  text "-" at 15497.6,6615 h60
  text "-" at 16647.26,6615 h60
  text "D" at 7798.65,6605.01 h66.67
  text "2" at 8333.62,6465 h60
  text "23.62mil (0.600mm)" at 8923.46,6465 h60
  text "PTH" at 10073.12,6465 h60
  text "Slot" at 10579,6465 h60
  text "Top Layer - Bottom Layer" at 11312.8,6465 h60
  text "Pad" at 12812.35,6465 h60
  text "Rounded" at 13402.2,6465 h60
  text "r90_170h60_140r100" at 14148,6465 h60
  text "55.12mil (1.400mm)" at 15497.6,6465 h60
  text "31.50mil (0.800mm)" at 16647.26,6465 h60
  text "2" at 8333.62,6315 h60
  text "23.62mil (0.600mm)" at 8923.46,6315 h60
  text "PTH" at 10073.12,6315 h60
  text "Slot" at 10579,6315 h60
  text "Top Layer - Bottom Layer" at 11312.8,6315 h60
  text "Pad" at 12812.35,6315 h60
  text "Rounded" at 13402.2,6315 h60
  text "(Mixed)" at 14148,6315 h60
  text "66.93mil (1.700mm)" at 15497.6,6315 h60
  text "43.31mil (1.100mm)" at 16647.26,6315 h60
  text "2" at 8333.62,6165 h60
  text "24.41mil (0.620mm)" at 8923.46,6165 h60
  text "NPTH" at 10073.12,6165 h60
  text "Round" at 10579,6165 h60
  text "Top Layer - Bottom Layer" at 11312.8,6165 h60
  text "Pad" at 12812.35,6165 h60
  text "Rounded" at 13402.2,6165 h60
  text "c0hn62" at 14148,6165 h60
  text "-" at 15497.6,6165 h60
  text "-" at 16647.26,6165 h60
  text "4" at 8333.62,6015 h60
  text "35.43mil (0.900mm)" at 8923.46,6015 h60
  text "PTH" at 10073.12,6015 h60
  text "Round" at 10579,6015 h60
  text "Top Layer - Bottom Layer" at 11312.8,6015 h60
  text "Pad" at 12812.35,6015 h60
  text "(Mixed)" at 13402.2,6015 h60
  text "(Mixed)" at 14148,6015 h60
  text "-" at 15497.6,6015 h60
  text "-" at 16647.26,6015 h60
  text "2" at 8333.62,5865 h60
  text "39.37mil (1.000mm)" at 8923.46,5865 h60
  text "PTH" at 10073.12,5865 h60
  text "Round" at 10579,5865 h60
  text "Top Layer - Bottom Layer" at 11312.8,5865 h60
  text "Pad" at 12812.35,5865 h60
  text "Rounded" at 13402.2,5865 h60
  text "c180h100m185mx185p180" at 14148,5865 h60
  text "-" at 15497.6,5865 h60
  text "-" at 16647.26,5865 h60
  text "6" at 8333.62,5715 h60
  text "47.24mil (1.200mm)" at 8923.46,5715 h60
  text "PTH" at 10073.12,5715 h60
  text "Round" at 10579,5715 h60
  text "Top Layer - Bottom Layer" at 11312.8,5715 h60
  text "Pad" at 12812.35,5715 h60
  text "Rounded" at 13402.2,5715 h60
  text "(Mixed)" at 14148,5715 h60
  text "-" at 15497.6,5715 h60
  text "-" at 16647.26,5715 h60
  text "8" at 8333.62,5565 h60
  text "51.18mil (1.300mm)" at 8923.46,5565 h60
  text "PTH" at 10073.12,5565 h60
  text "Round" at 10579,5565 h60
  text "Top Layer - Bottom Layer" at 11312.8,5565 h60
  text "Pad" at 12812.35,5565 h60
  text "Rounded" at 13402.2,5565 h60
  text "(Mixed)" at 14148,5565 h60
  text "-" at 15497.6,5565 h60
  text "-" at 16647.26,5565 h60
  text "24" at 8333.62,5415 h60
  text "51.18mil (1.300mm)" at 8923.46,5415 h60
  text "PTH" at 10073.12,5415 h60
  text "Round" at 10579,5415 h60
  text "Top Layer - Bottom Layer" at 11312.8,5415 h60
  text "Pad" at 12812.35,5415 h60
  text "Rounded" at 13402.2,5415 h60
  text "(Mixed)" at 14148,5415 h60
  text "-" at 15497.6,5415 h60
  text "-" at 16647.26,5415 h60
  text "7" at 8333.62,5265 h60
  text "59.06mil (1.500mm)" at 8923.46,5265 h60
  text "PTH" at 10073.12,5265 h60
  text "Round" at 10579,5265 h60
  text "Top Layer - Bottom Layer" at 11312.8,5265 h60
  text "Pad" at 12812.35,5265 h60
  text "Rounded" at 13402.2,5265 h60
  text "(Mixed)" at 14148,5265 h60
  text "-" at 15497.6,5265 h60
  text "-" at 16647.26,5265 h60
  text "15" at 8333.62,5115 h60
  text "60.00mil (1.524mm)" at 8923.46,5115 h60
  text "PTH" at 10073.12,5115 h60
  text "Round" at 10579,5115 h60
  text "Top Layer - Bottom Layer" at 11312.8,5115 h60
  text "Pad" at 12812.35,5115 h60
  text "Rounded" at 13402.2,5115 h60
  text "(Mixed)" at 14148,5115 h60
  text "-" at 15497.6,5115 h60
  text "-" at 16647.26,5115 h60
  text "22" at 8333.62,4965 h60
  text "62.99mil (1.600mm)" at 8923.46,4965 h60
  text "PTH" at 10073.12,4965 h60
  text "Round" at 10579,4965 h60
  text "Top Layer - Bottom Layer" at 11312.8,4965 h60
  text "Pad" at 12812.35,4965 h60
  text "(Mixed)" at 13402.2,4965 h60
  text "(Mixed)" at 14148,4965 h60
  text "-" at 15497.6,4965 h60
  text "-" at 16647.26,4965 h60
  text "12" at 8333.62,4815 h60
  text "70.87mil (1.800mm)" at 8923.46,4815 h60
  text "NPTH" at 10073.12,4815 h60
  text "Round" at 10579,4815 h60
  text "Top Layer - Bottom Layer" at 11312.8,4815 h60
  text "Pad" at 12812.35,4815 h60
  text "Rounded" at 13402.2,4815 h60
  text "(Mixed)" at 14148,4815 h60
  text "-" at 15497.6,4815 h60
  text "-" at 16647.26,4815 h60
  text "2" at 8333.62,4665 h60
  text "70.87mil (1.800mm)" at 8923.46,4665 h60
  text "PTH" at 10073.12,4665 h60
  text "Round" at 10579,4665 h60
  text "Top Layer - Bottom Layer" at 11312.8,4665 h60
  text "Pad" at 12812.35,4665 h60
  text "(Mixed)" at 13402.2,4665 h60
  text "(Mixed)" at 14148,4665 h60
  text "-" at 15497.6,4665 h60
  text "-" at 16647.26,4665 h60
  text "B" at 7798.65,4655.01 h66.67
  text "4" at 8333.62,4515 h60
  text "70.87mil (1.800mm)" at 8923.46,4515 h60
  text "PTH" at 10073.12,4515 h60
  text "Slot" at 10579,4515 h60
  text "Top Layer - Bottom Layer" at 11312.8,4515 h60
  text "Pad" at 12812.35,4515 h60
  text "(Mixed)" at 13402.2,4515 h60
  text "(Mixed)" at 14148,4515 h60
  text "216.54mil (5.500mm)" at 15497.6,4515 h60
  text "145.67mil (3.700mm)" at 16647.26,4515 h60
  text "C" at 7798.65,4505.01 h66.67
  text "4" at 8333.62,4365 h60
  text "74.80mil (1.900mm)" at 8923.46,4365 h60
  text "PTH" at 10073.12,4365 h60
  text "Round" at 10579,4365 h60
  text "Top Layer - Bottom Layer" at 11312.8,4365 h60
  text "Pad" at 12812.35,4365 h60
  text "Rounded" at 13402.2,4365 h60
  text "c290h190m295mx295p290" at 14148,4365 h60
  text "-" at 15497.6,4365 h60
  text "-" at 16647.26,4365 h60
  text "4" at 8333.62,4215 h60
  text "86.61mil (2.200mm)" at 8923.46,4215 h60
  text "PTH" at 10073.12,4215 h60
  text "Round" at 10579,4215 h60
  text "Top Layer - Bottom Layer" at 11312.8,4215 h60
  text "Pad" at 12812.35,4215 h60
  text "Rounded" at 13402.2,4215 h60
  text "c350h220m355mx355p350" at 14148,4215 h60
  text "-" at 15497.6,4215 h60
  text "-" at 16647.26,4215 h60
  text "6" at 8333.62,4065 h60
  text "102.36mil (2.600mm)" at 8923.46,4065 h60
  text "PTH" at 10073.12,4065 h60
  text "Round" at 10579,4065 h60
  text "Top Layer - Bottom Layer" at 11312.8,4065 h60
  text "Pad" at 12812.35,4065 h60
  text "(Mixed)" at 13402.2,4065 h60
  text "(Mixed)" at 14148,4065 h60
  text "-" at 15497.6,4065 h60
  text "-" at 16647.26,4065 h60
  text "4" at 8333.62,3915 h60
  text "137.79mil (3.500mm)" at 8923.46,3915 h60
  text "NPTH" at 10073.12,3915 h60
  text "Round" at 10579,3915 h60
  text "Top Layer - Bottom Layer" at 11312.8,3915 h60
  text "Pad" at 12812.35,3915 h60
  text "Rounded" at 13402.2,3915 h60
  text "c500hn350" at 14148,3915 h60
  text "-" at 15497.6,3915 h60
  text "-" at 16647.26,3915 h60
  text "A" at 7798.65,3905.01 h66.67
  text "491 Total" at 8333.62,3765 h60
  text "Slot definitions :" at 7827.74,3620.03 h60
  text "Routed Path Length" at 8860.43,3620.03 h60
  text "= Calculated from tool start centre position to tool end centre position." at 9963.1,3620.03 h60
  text "Hole Length" at 8860.43,3520.05 h60
  text "= Routed Path Length + Tool Size = Slot length as defined in the PCB layout" at 9553.23,3520.05 h60

## Dimensions
4714,5879.66 to 4714,5171 on Dimension
-121,6942 to 6897,6942 on Dimension
-121,-139 to -121,6942 on Dimension